# Altium PCB Thunderscope_Rev5.3.PcbDoc (part 12 of 14)
Units mil, origin at the board's own origin, x right, y up, seen from the top; angles counter-clockwise.
Board outline 3937.01 x 3838.58 mil, 6 copper layers (F.Cu, In1.Cu (GND), In2.Cu (Sign), In3.Cu (Sign), In4.Cu (GND), B.Cu), stack 60.556 mil thick; 911 components, 486 nets, 2834 pads, 2761 vias.
Unrouted connection lines stored in the file: 618.
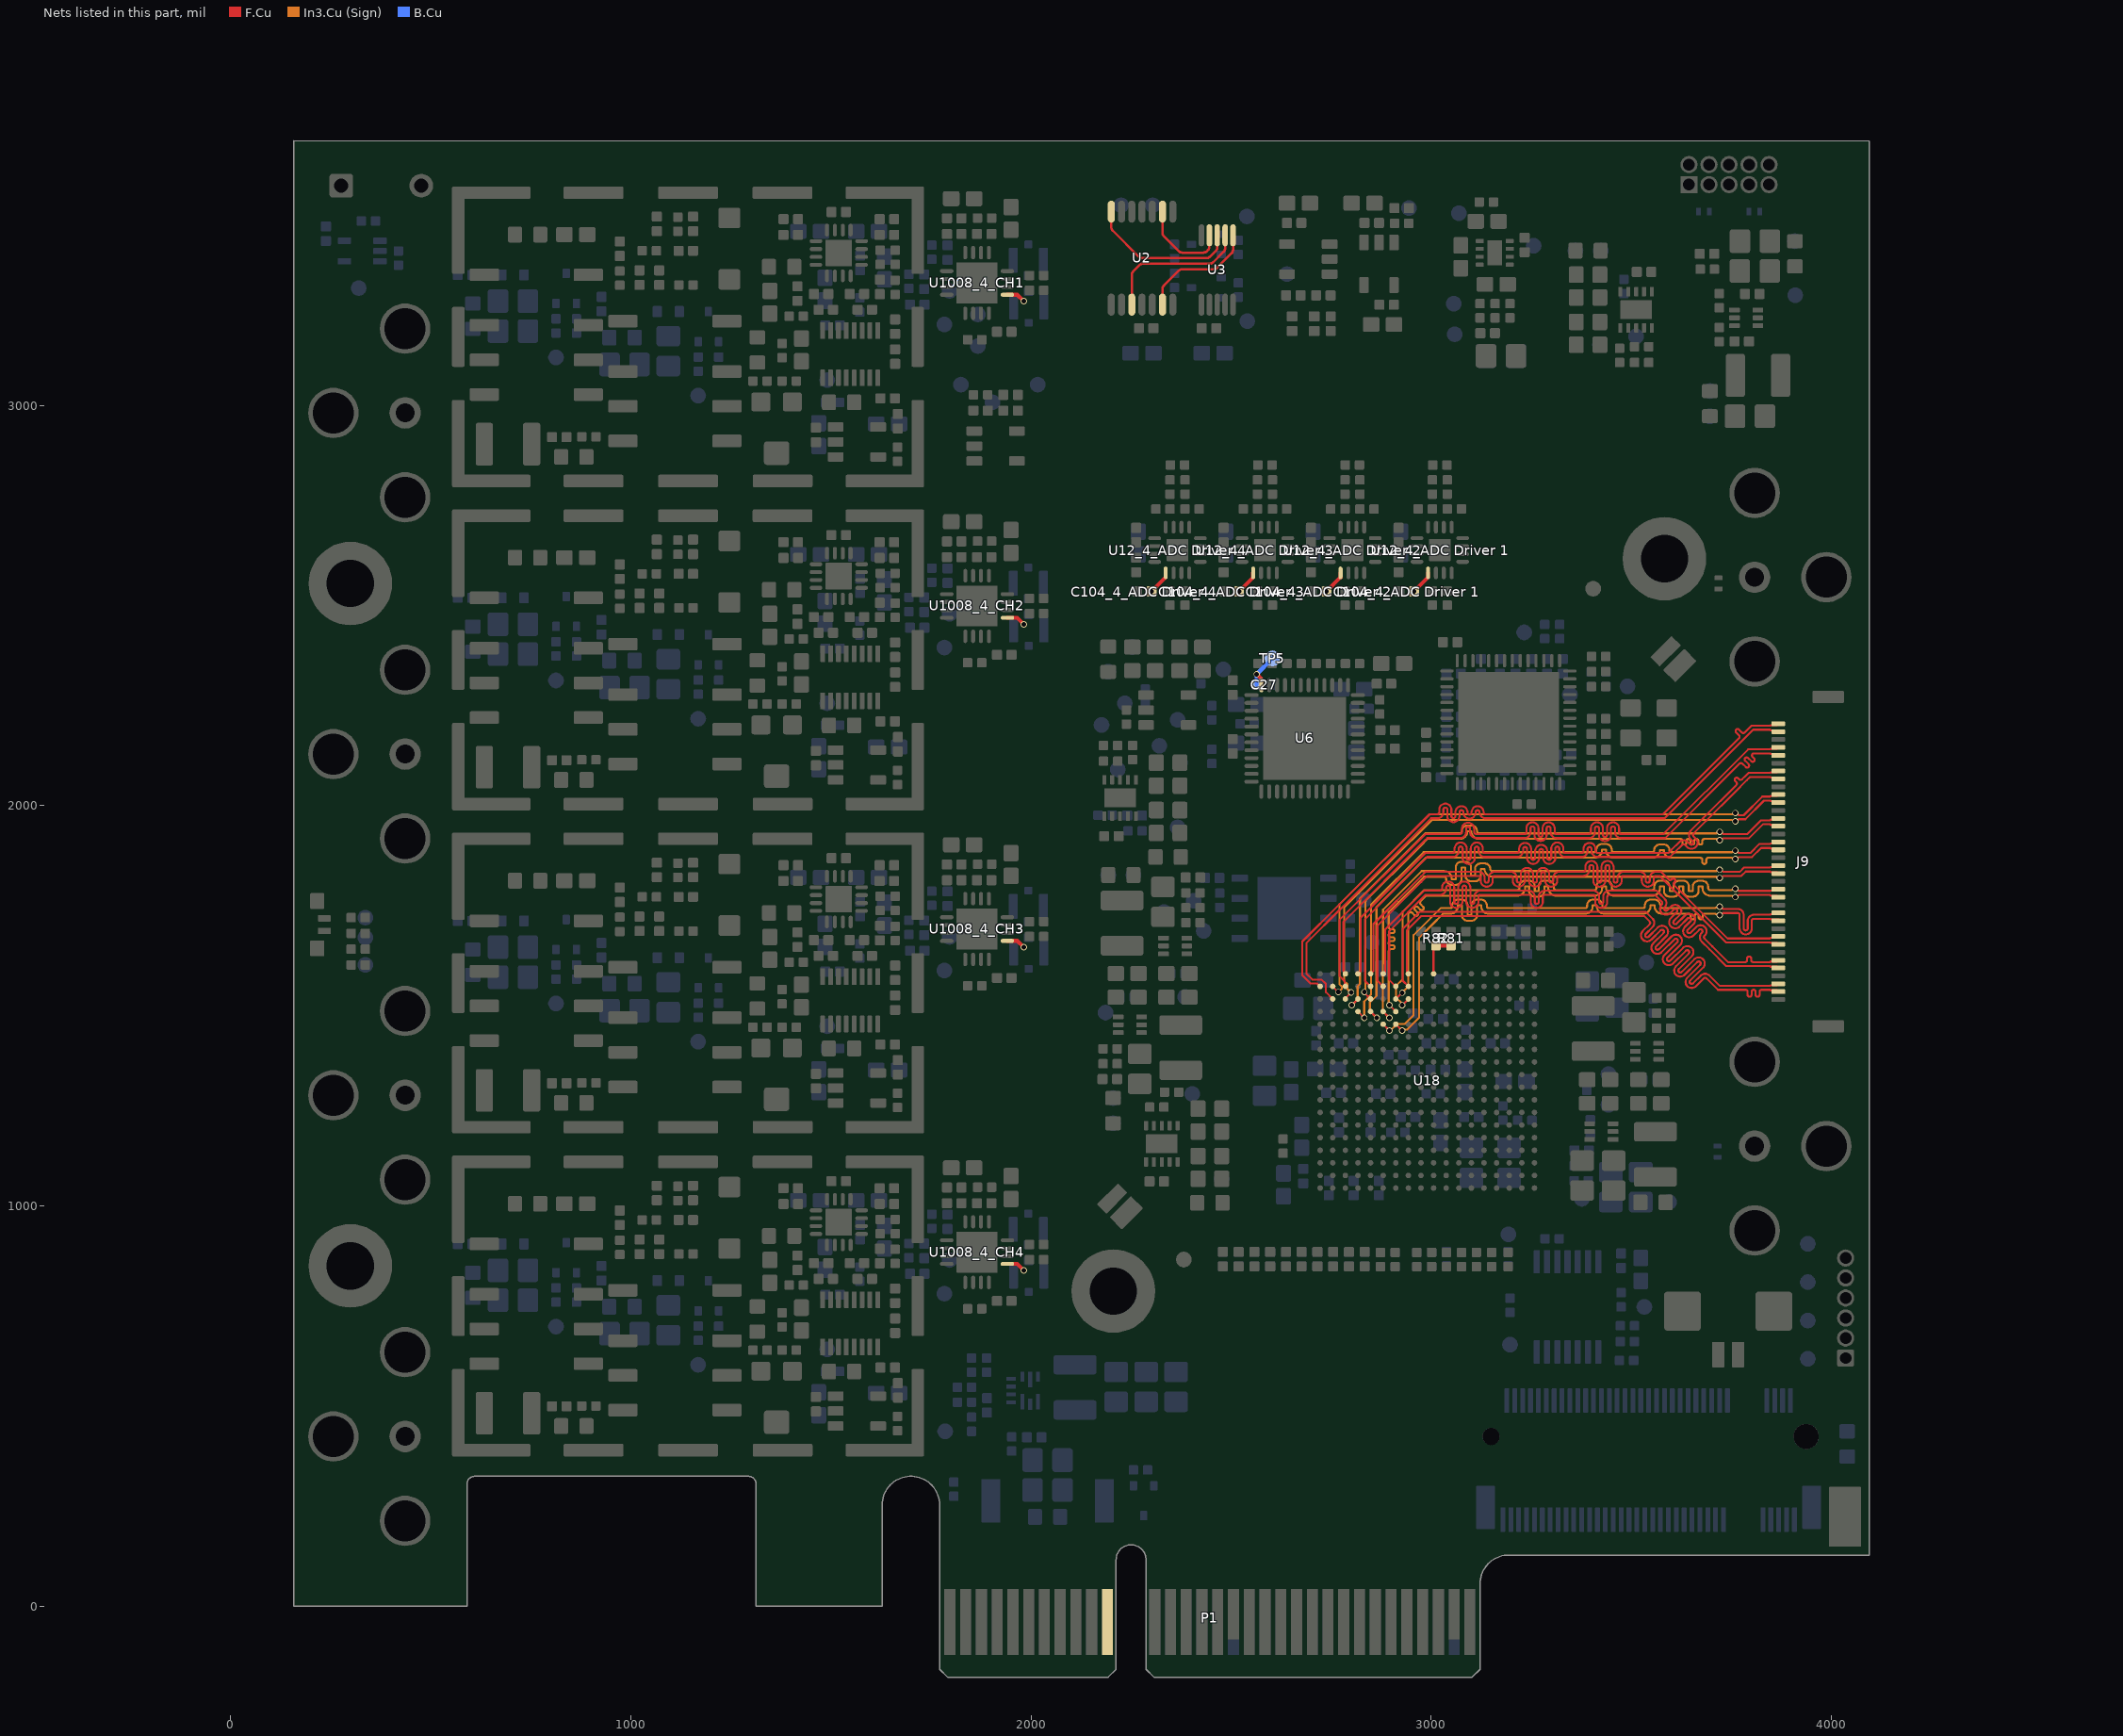
[diagram p15: the nets of this part, all layers, seen from the top]

## Via types
v1: diameter 16, hole 11.81, F.Cu to B.Cu, tented both sides, 2761 vias

## Nets (pads, with @x,y where several pads share a name; then routed paths per layer and width w, separated by ;. In a path a pad name is that pad's centre, name@x,y a point inside that pad or via, vN(x,y) a via of type N, cw(c..) or ccw(c..) an arc to the next point about the centre after c; other vN are vias at no path point) (continued)
USERIO.USRIO_1_N: J9.8 U18.F17 | length 1678.7
  F.Cu w5: U18.F17@2879.92,1548.72 2865.49,1563.15 2865.49,1700.14 2974.98,1809.63 2990.16,1824.8 3118.4,1824.8 cw(c3118.4,1819.8) 3123.4,1819.8 3123.4,1812.81 ccw(c3138.53,1812.81) 3138.53,1797.69 ccw(c3138.53,1812.81) 3153.65,1812.81 3153.65,1819.8 cw(c3158.65,1819.8) 3158.65,1824.8 3198.91,1824.8 cw(c3198.91,1819.8) 3203.91,1819.8 3203.91,1812.81 ccw(c3219.03,1812.81) 3219.03,1797.69 ccw(c3219.03,1812.81) 3234.16,1812.81 3234.16,1829.44 cw(c3239.16,1829.44) 3239.16,1834.44 cw(c3239.16,1829.44) 3244.16,1829.44 3244.16,1812.81 ccw(c3259.29,1812.81) 3259.29,1797.69 ccw(c3259.29,1812.81) 3274.42,1812.81 3274.42,1829.44 cw(c3279.42,1829.44) 3279.42,1834.44 cw(c3279.42,1829.44) 3284.42,1829.44 3284.42,1812.81 ccw(c3299.54,1812.81) 3299.54,1797.69 ccw(c3299.54,1812.81) 3314.67,1812.81 3314.67,1819.8 cw(c3319.67,1819.8) 3319.67,1824.8 3380.05,1824.8 ccw(c3380.05,1839.93) 3395.18,1839.93 3395.18,1846.92 cw(c3400.18,1846.92) 3400.18,1851.92 cw(c3400.18,1846.92) 3405.18,1846.92 3405.18,1812.81 ccw(c3420.3,1812.81) 3420.3,1797.69 ccw(c3420.3,1812.81) 3435.43,1812.81 3435.43,1846.92 cw(c3440.43,1846.92) 3440.43,1851.92 cw(c3440.43,1846.92) 3445.43,1846.92 3445.43,1812.81 ccw(c3460.56,1812.81) 3460.56,1797.69 ccw(c3460.56,1812.81) 3475.68,1812.81 3475.68,1819.8 cw(c3480.68,1819.8) 3480.68,1824.8 3520.94,1824.8 cw(c3520.94,1819.8) 3525.94,1819.8 3525.94,1812.81 ccw(c3541.06,1812.81) 3541.06,1797.69 ccw(c3541.06,1812.81) 3556.19,1812.81 3556.19,1819.8 cw(c3561.19,1819.8) 3561.19,1824.8 3569.94,1824.8 3580.72,1814.02 3590.38,1804.36 3736.42,1658.32 3847.04,1658.32 3848.41,1656.95 3863.72,1656.95 J9.8@3867.13,1653.54
USERIO.USRIO_1_P: J9.9 U18.E18 | length 1675.1
  F.Cu w5: U18.E18@2848.43,1580.22 2855.37,1587.16 2855.37,1704.33 2974.98,1823.95 2985.96,1834.93 3118.4,1834.93 cw(c3118.4,1819.8) 3133.53,1819.8 3133.53,1812.81 ccw(c3138.53,1812.81) 3138.53,1807.81 ccw(c3138.53,1812.81) 3143.53,1812.81 3143.53,1819.8 cw(c3158.65,1819.8) 3158.65,1834.93 3198.91,1834.93 cw(c3198.91,1819.8) 3214.03,1819.8 3214.03,1812.81 ccw(c3219.03,1812.81) 3219.03,1807.81 ccw(c3219.03,1812.81) 3224.03,1812.81 3224.03,1829.44 cw(c3239.16,1829.44) 3239.16,1844.57 cw(c3239.16,1829.44) 3254.29,1829.44 3254.29,1812.81 ccw(c3259.29,1812.81) 3259.29,1807.81 ccw(c3259.29,1812.81) 3264.29,1812.81 3264.29,1829.44 cw(c3279.42,1829.44) 3279.42,1844.57 cw(c3279.42,1829.44) 3294.54,1829.44 3294.54,1812.81 ccw(c3299.54,1812.81) 3299.54,1807.81 ccw(c3299.54,1812.81) 3304.54,1812.81 3304.54,1819.8 cw(c3319.67,1819.8) 3319.67,1834.93 3380.05,1834.93 ccw(c3380.05,1839.93) 3385.05,1839.93 3385.05,1846.92 cw(c3400.18,1846.92) 3400.18,1862.05 cw(c3400.18,1846.92) 3415.3,1846.92 3415.3,1812.81 ccw(c3420.3,1812.81) 3420.3,1807.81 ccw(c3420.3,1812.81) 3425.3,1812.81 3425.3,1846.92 cw(c3440.43,1846.92) 3440.43,1862.05 cw(c3440.43,1846.92) 3455.56,1846.92 3455.56,1812.81 ccw(c3460.56,1812.81) 3460.56,1807.81 ccw(c3460.56,1812.81) 3465.56,1812.81 3465.56,1819.8 cw(c3480.68,1819.8) 3480.68,1834.93 3520.94,1834.93 cw(c3520.94,1819.8) 3536.06,1819.8 3536.06,1812.81 ccw(c3541.06,1812.81) 3541.06,1807.81 ccw(c3541.06,1812.81) 3546.06,1812.81 3546.06,1819.8 cw(c3561.19,1819.8) 3561.19,1834.93 3574.13,1834.93 3587.88,1821.18 3590.38,1818.68 3591.53,1817.53 3593.3,1815.76 ccw(c3596.84,1819.29) 3600.37,1815.76 3601.36,1816.74 cw(c3604.89,1813.21) 3608.43,1816.74 cw(c3604.89,1813.21) 3608.43,1809.67 3607.44,1808.69 ccw(c3610.98,1805.15) 3607.44,1801.62 3623.21,1785.85 3624.98,1784.08 3740.61,1668.45 3847.04,1668.45 3848.41,1669.82 3863.72,1669.82 J9.9@3867.13,1673.23
USERIO.USRIO_2_N: J9.5 U18.G17 | length 1689.7
  F.Cu w5: U18.G17@2911.42,1548.72 2894.97,1565.17 2894.97,1686.31 2986.22,1777.56 3014.61,1777.56 3022.17,1777.56 ccw(c3022.17,1792.69) 3037.3,1792.69 3037.3,1795.6 cw(c3042.3,1795.6) 3042.3,1800.6 cw(c3042.3,1795.6) 3047.3,1795.6 3047.3,1759.78 ccw(c3062.43,1759.78) 3062.43,1744.66 ccw(c3062.43,1759.78) 3077.55,1759.78 3077.55,1795.6 cw(c3082.55,1795.6) 3082.55,1800.6 cw(c3082.55,1795.6) 3087.55,1795.6 3087.55,1759.78 ccw(c3102.68,1759.78) 3102.68,1744.66 ccw(c3102.68,1759.78) 3117.81,1759.78 3117.81,1772.56 cw(c3122.81,1772.56) 3122.81,1777.56 3243.57,1777.56 cw(c3243.57,1772.56) 3248.57,1772.56 3248.57,1759.78 ccw(c3263.7,1759.78) 3263.7,1744.66 ccw(c3263.7,1759.78) 3278.82,1759.78 3278.82,1772.56 cw(c3283.82,1772.56) 3283.82,1777.56 3404.58,1777.56 cw(c3404.58,1772.56) 3409.58,1772.56 3409.58,1759.78 ccw(c3424.71,1759.78) 3424.71,1744.66 ccw(c3424.71,1759.78) 3439.84,1759.78 3439.84,1772.56 cw(c3444.84,1772.56) 3444.84,1777.56 3529.86,1777.56 3552.95,1777.56 3559.06,1777.56 3562.84,1773.79 3576.1,1760.52 cw(c3572.56,1756.99) 3576.1,1753.45 ccw(c3586.79,1742.76) 3576.06,1732.1 3576.13,1732.03 ; 3576.14,1732.02 ccw(c3586.79,1742.76) 3597.49,1732.06 3606.17,1740.74 cw(c3609.71,1737.2) 3613.24,1740.74 cw(c3609.71,1737.2) 3613.24,1733.67 3599.17,1719.6 ccw(c3609.87,1708.9) 3599.17,1698.21 ccw(c3609.87,1708.9) 3618.84,1696.72 3619.08,1696.72 3640.78,1718.42 cw(c3644.32,1714.89) 3647.85,1718.42 cw(c3644.32,1714.89) 3647.85,1711.35 ; 3647.83,1711.33 3633.81,1697.31 ccw(c3644.51,1686.62) 3653.48,1674.44 3653.72,1674.44 3669.24,1689.96 cw(c3672.78,1686.42) 3676.32,1689.96 cw(c3672.78,1686.43) 3676.32,1682.89 ; 3676.29,1682.86 3675.72,1682.29 ccw(c3686.42,1671.6) 3675.72,1660.9 3695.3,1641.32 3737.35,1599.27 3847.04,1599.27 3848.41,1597.89 3863.72,1597.89 J9.5@3867.13,1594.49
USERIO.USRIO_2_P: J9.6 U18.F18 | length 1689.9
  F.Cu w5: U18.F18@2879.92,1580.22 2884.84,1585.14 2884.84,1690.5 2982.03,1787.69 2992.92,1787.69 3014.61,1787.69 3022.17,1787.69 ccw(c3022.17,1792.69) 3027.17,1792.69 3027.17,1795.6 cw(c3042.3,1795.6) 3042.3,1810.73 cw(c3042.3,1795.6) 3057.43,1795.6 3057.43,1759.78 ccw(c3062.43,1759.78) 3062.43,1754.78 ccw(c3062.43,1759.78) 3067.43,1759.78 3067.43,1795.6 cw(c3082.55,1795.6) 3082.55,1810.73 cw(c3082.55,1795.6) 3097.68,1795.6 3097.68,1759.78 ccw(c3102.68,1759.78) 3102.68,1754.78 ccw(c3102.68,1759.78) 3107.68,1759.78 3107.68,1772.56 cw(c3122.81,1772.56) 3122.81,1787.69 3243.57,1787.69 cw(c3243.57,1772.56) 3258.7,1772.56 3258.7,1759.78 ccw(c3263.7,1759.78) 3263.7,1754.78 ccw(c3263.7,1759.78) 3268.7,1759.78 3268.7,1772.56 cw(c3283.82,1772.56) 3283.82,1787.69 3404.58,1787.69 cw(c3404.58,1772.56) 3419.71,1772.56 3419.71,1759.78 ccw(c3424.71,1759.78) 3424.71,1754.78 ccw(c3424.71,1759.78) 3429.71,1759.78 3429.71,1772.56 cw(c3444.84,1772.56) 3444.84,1787.69 3529.86,1787.69 3563.07,1787.69 3563.26,1787.69 3570,1780.95 3583.26,1767.68 cw(c3572.56,1756.99) 3583.26,1746.29 ccw(c3586.79,1742.76) 3583.26,1739.22 ccw(c3586.79,1742.76) 3590.33,1739.22 3599.05,1747.94 cw(c3609.71,1737.2) 3620.4,1747.9 cw(c3609.71,1737.2) 3620.4,1726.51 3606.33,1712.44 ccw(c3609.87,1708.9) 3606.33,1705.37 ccw(c3609.87,1708.9) 3613.4,1705.37 ; 3613.43,1705.39 3633.66,1725.62 cw(c3644.32,1714.89) 3655.01,1725.58 cw(c3644.32,1714.89) 3656.5,1705.92 3656.5,1705.68 3640.97,1690.15 ccw(c3644.51,1686.62) 3640.97,1683.08 ccw(c3644.51,1686.62) 3648.04,1683.08 3662.12,1697.16 cw(c3672.78,1686.42) 3683.48,1697.12 cw(c3672.78,1686.43) 3684.96,1677.45 3684.96,1677.21 3682.88,1675.13 ccw(c3686.42,1671.6) 3682.88,1668.06 3702.46,1648.48 3741.55,1609.39 3781.92,1609.39 3784.42,1609.39 ccw(c3784.42,1614.39) 3789.42,1614.39 3789.42,1618.55 cw(c3794.42,1618.55) 3799.42,1618.55 3799.42,1614.39 ccw(c3804.42,1614.39) 3804.42,1609.39 3824.88,1609.39 3847.04,1609.39 3848.41,1610.77 3863.72,1610.77 J9.6@3867.13,1614.17
USERIO.USRIO_3_N: J9.2 U18.H18 | length 1689.4
  F.Cu w5: U18.H18@2942.91,1580.22 2939.26,1583.87 2939.26,1688.72 2945.13,1694.58 2972.02,1721.48 2975.07,1724.53 3511.75,1724.53 3529.6,1724.53 3532.03,1724.53 3545.59,1710.98 ; 3545.6,1710.96 cw(c3542.08,1707.41) 3545.62,1703.88 3528.69,1686.95 ccw(c3539.38,1676.25) 3528.69,1665.55 ccw(c3539.38,1676.25) 3550.08,1665.55 3573.18,1688.66 cw(c3576.72,1685.12) 3580.25,1688.66 cw(c3576.72,1685.12) 3580.25,1681.59 ; 3580.23,1681.56 3554.59,1655.92 ccw(c3565.29,1645.23) 3554.59,1634.53 ccw(c3565.29,1645.23) 3574.26,1633.05 3574.5,1633.05 3607.82,1666.37 cw(c3611.36,1662.84) 3614.89,1666.37 cw(c3611.36,1662.84) 3614.89,1659.3 ; 3614.87,1659.27 3583.05,1627.46 ccw(c3593.75,1616.76) 3583.05,1606.07 ccw(c3593.75,1616.76) 3602.72,1604.58 3602.96,1604.58 3636.29,1637.91 cw(c3639.82,1634.37) 3643.36,1637.91 cw(c3639.82,1634.37) 3643.36,1630.84 ; 3643.33,1630.81 3611.52,1599 ccw(c3622.21,1588.3) 3631.18,1576.12 3631.43,1576.12 3664.75,1609.44 cw(c3668.29,1605.91) 3671.82,1609.44 cw(c3668.29,1605.91) 3671.82,1602.37 ; 3671.8,1602.35 3639.98,1570.53 ccw(c3650.68,1559.84) 3659.65,1547.66 3659.89,1547.66 3680.86,1568.63 cw(c3684.4,1565.1) 3687.95,1568.61 3693.28,1563.28 3716.35,1540.21 3773,1540.21 3785.5,1540.21 cw(c3785.5,1535.21) 3790.5,1535.21 3790.5,1527.78 ccw(c3795.5,1527.78) 3800.5,1527.78 3800.5,1535.21 cw(c3805.5,1535.21) 3810.5,1535.21 3810.5,1527.78 ccw(c3815.5,1527.78) 3820.5,1527.78 3820.5,1535.21 cw(c3825.5,1535.21) 3825.5,1540.21 3839.67,1540.21 3847.04,1540.21 3848.41,1538.84 3863.72,1538.84 J9.2@3867.13,1535.43
USERIO.USRIO_3_P: J9.3 U18.H17 | length 1690
  F.Cu w5: U18.H17@2942.91,1548.72 2928.48,1563.15 2928.48,1692.26 2937.97,1701.75 2964.86,1728.64 2970.88,1734.66 3521.87,1734.66 3529.6,1734.66 3536.23,1734.66 3552.78,1718.11 ; 3552.8,1718.09 3554.26,1716.62 3554.26,1716.38 cw(c3542.08,1707.41) 3552.78,1696.72 3535.85,1679.78 ccw(c3539.38,1676.25) 3535.85,1672.71 ccw(c3539.38,1676.25) 3542.92,1672.71 3566.02,1695.82 cw(c3576.72,1685.12) 3587.42,1695.82 cw(c3576.72,1685.12) 3588.9,1676.15 3588.9,1675.91 3561.75,1648.76 ccw(c3565.29,1645.23) 3561.75,1641.69 ccw(c3565.29,1645.23) 3568.82,1641.69 ; 3568.85,1641.72 3600.7,1673.57 cw(c3611.36,1662.84) 3622.06,1673.53 cw(c3611.36,1662.84) 3623.54,1653.86 3623.54,1653.62 3590.21,1620.3 ccw(c3593.75,1616.76) 3590.21,1613.23 ccw(c3593.75,1616.76) 3597.29,1613.23 3629.17,1645.11 cw(c3639.82,1634.37) 3650.52,1645.07 cw(c3639.82,1634.37) 3652,1625.4 3652,1625.16 3618.68,1591.84 ccw(c3622.21,1588.3) 3618.68,1584.76 ccw(c3622.21,1588.3) 3625.75,1584.76 ; 3625.78,1584.79 3657.63,1616.64 cw(c3668.29,1605.91) 3678.98,1616.61 cw(c3668.29,1605.91) 3680.47,1596.94 3680.47,1596.7 3647.14,1563.37 ccw(c3650.68,1559.84) 3647.14,1556.3 ccw(c3650.68,1559.84) 3654.21,1556.3 ; 3654.24,1556.33 3673.7,1575.79 cw(c3684.4,1565.1) 3693.37,1577.27 3693.61,1577.27 3695.07,1575.81 ; 3695.09,1575.79 3700.44,1570.44 3720.55,1550.34 3847.04,1550.34 3848.41,1551.71 3863.72,1551.71 J9.3@3867.13,1555.12
USERIO.USRIO_4_N: J9.12 U18.F14 | length 1460.8
  F.Cu w5: U18.F14@2879.98,1454.1 2895.68,1438.4 v1@2895.73,1438.35 ; v1(3721,1747.59) 3723.98,1747.59 3729.41,1742.15 3737.97,1742.15 3765.66,1742.15 cw(c3765.66,1727.02) 3780.78,1727.02 3780.78,1693.58 ccw(c3785.78,1693.58) 3785.78,1688.58 ccw(c3785.78,1693.58) 3790.78,1693.58 3790.78,1712.38 cw(c3805.91,1712.38) 3805.91,1727.5 3841.88,1727.5 3847.04,1727.5 3848.41,1728.88 3863.72,1728.88 J9.12@3867.13,1732.28
  In3.Cu (Sign) w5: v1(2895.73,1438.45) 2898.17,1438.45 2914.56,1454.84 2933.64,1454.84 2955.93,1477.13 2955.93,1676.6 2964.17,1684.84 2998.35,1719.02 3023.45,1744.12 3047.5,1744.12 ccw(c3047.5,1749.12) 3052.5,1749.12 3052.5,1751.24 cw(c3066.57,1751.24) 3066.57,1765.31 3076.57,1765.31 cw(c3076.57,1751.24) 3090.64,1751.24 3090.64,1726.88 3100.64,1726.88 3100.64,1751.24 cw(c3114.71,1751.24) 3114.71,1765.31 3124.71,1765.31 cw(c3124.71,1751.24) 3138.78,1751.24 3138.78,1749.12 ccw(c3143.78,1749.12) 3143.78,1744.12 3384.47,1744.12 ccw(c3384.47,1749.12) 3389.47,1749.12 3389.47,1751.24 cw(c3403.54,1751.24) 3403.54,1765.31 3413.54,1765.31 cw(c3413.54,1751.24) 3427.61,1751.24 3427.61,1749.12 ccw(c3432.61,1749.12) 3432.61,1744.12 3528.88,1744.12 ccw(c3528.88,1749.12) 3533.88,1749.12 3533.88,1751.24 cw(c3547.95,1751.24) 3547.95,1765.31 3557.95,1765.31 cw(c3557.95,1751.24) 3572.02,1751.24 3572.02,1749.12 ccw(c3577.02,1749.12) 3577.02,1744.12 3609.88,1744.12 3709.76,1744.12 3711.12,1745.48 3718.9,1745.48 v1(3721,1747.59)
USERIO.USRIO_4_P: J9.11 U18.G14 | length 1461.9
  F.Cu w5: U18.G14@2911.47,1454.1 v1@2927.17,1438.4 ; v1(3721,1726.59) 3723.98,1726.59 3729.41,1732.02 3737.97,1732.02 3765.66,1732.02 cw(c3765.66,1727.02) 3770.66,1727.02 3770.66,1693.58 ccw(c3785.78,1693.58) 3785.78,1678.45 ccw(c3785.78,1693.58) 3800.91,1693.58 3800.91,1712.38 cw(c3805.91,1712.38) 3805.91,1717.38 3841.88,1717.38 3847.04,1717.38 3848.41,1716 3867.86,1716 J9.11@3868.45,1715.41
  In3.Cu (Sign) w5: v1(2927.22,1438.45) 2929.33,1440.55 2935.43,1440.55 2935.65,1440.77 2939.47,1440.77 2970,1471.3 2970,1670.77 3001.36,1702.13 3029.28,1730.05 3047.5,1730.05 ccw(c3047.5,1749.12) 3066.57,1749.12 3066.57,1751.24 3076.57,1751.24 3076.57,1726.88 ccw(c3090.64,1726.88) 3090.64,1712.81 3100.64,1712.81 ccw(c3100.64,1726.88) 3114.71,1726.88 3114.71,1751.24 3124.71,1751.24 3124.71,1749.12 ccw(c3143.78,1749.12) 3143.78,1730.05 3384.47,1730.05 ccw(c3384.47,1749.12) 3403.54,1749.12 3403.54,1751.24 3413.54,1751.24 3413.54,1749.12 ccw(c3432.61,1749.12) 3432.61,1730.05 3528.88,1730.05 ccw(c3528.88,1749.12) 3547.95,1749.12 3547.95,1751.24 3557.95,1751.24 3557.95,1749.12 ccw(c3577.02,1749.12) 3577.02,1730.05 3609.88,1730.05 3630.91,1730.05 3643.41,1730.05 cw(c3643.41,1725.05) 3648.41,1725.05 3648.41,1721.18 ccw(c3653.41,1721.18) 3658.41,1721.18 3658.41,1725.05 cw(c3663.41,1725.05) 3668.41,1725.05 3668.41,1721.18 ccw(c3673.41,1721.18) 3678.41,1721.18 3678.41,1725.05 cw(c3683.41,1725.05) 3683.41,1730.05 3702.79,1730.05 3709.76,1730.05 3711.12,1728.69 3718.9,1728.69 v1(3721,1726.59)
USERIO.USRIO_5_N: J9.15 U18.H16 | length 1443.6
  F.Cu w5: v1(2927.22,1501.34) U18.H16@2942.97,1517.09 ; v1(3760,1792.84) 3762.98,1792.84 3768.41,1787.41 3847.04,1787.41 3847.56,1787.93 3863.72,1787.93 J9.15@3867.13,1791.34
  In3.Cu (Sign) w5: v1(2927.22,1501.34) 2927.22,1506.26 2911.82,1521.66 2911.82,1549.62 2928.7,1566.49 2928.7,1735.94 2982.13,1789.38 3157.8,1789.38 3215.48,1789.38 ccw(c3215.48,1794.38) 3220.48,1794.38 3220.48,1798.62 cw(c3234.55,1798.62) 3234.55,1812.69 3244.55,1812.69 cw(c3244.55,1798.62) 3258.62,1798.62 3258.61,1787.06 3268.61,1787.06 3268.61,1798.62 cw(c3282.68,1798.62) 3282.68,1812.69 3292.68,1812.69 cw(c3292.68,1798.62) 3306.75,1798.62 3306.75,1794.38 ccw(c3311.75,1794.38) 3311.75,1789.38 3408.03,1789.38 ccw(c3408.03,1794.38) 3413.03,1794.38 3413.03,1798.62 cw(c3427.1,1798.62) 3427.1,1812.69 3437.1,1812.69 cw(c3437.1,1798.62) 3451.17,1798.62 3451.17,1794.38 ccw(c3456.17,1794.38) 3456.17,1789.38 3552.44,1789.38 ccw(c3552.44,1794.38) 3557.44,1794.38 3557.44,1798.62 cw(c3571.51,1798.62) 3571.51,1812.69 3581.51,1812.69 cw(c3581.51,1798.62) 3595.58,1798.62 3595.58,1787.06 3605.58,1787.06 3605.58,1798.62 cw(c3619.65,1798.62) 3619.65,1812.69 3629.65,1812.69 cw(c3629.65,1798.62) 3643.72,1798.62 3643.72,1787.06 3653.72,1787.06 3653.72,1798.19 cw(c3667.79,1798.19) 3667.79,1812.26 3677.79,1812.26 cw(c3677.79,1798.19) 3691.86,1798.19 3691.86,1794.38 ccw(c3696.86,1794.38) 3696.86,1789.38 3722.59,1789.38 3751.57,1789.38 3752.93,1790.74 3757.9,1790.74 v1(3760,1792.84)
USERIO.USRIO_5_P: J9.14 U18.G16 | length 1445
  F.Cu w5: U18.G16@2911.47,1517.09 2911.51,1517.13 v1@2927.22,1532.84 ; v1(3760,1771.84) 3762.98,1771.84 3768.41,1777.28 3846.19,1777.28 3848.41,1775.06 3863.72,1775.06 J9.14@3867.13,1771.65 ; J9.14@3869.22,1773.75 J9.14@3871.32,1771.65
  In3.Cu (Sign) w5: v1@2927.22,1532.84 2942.27,1547.89 2942.27,1721.28 2942.27,1730.12 2944.93,1732.77 cw(c2948.46,1729.23) 2952,1732.77 2958.56,1726.21 ccw(c2962.09,1729.74) 2965.63,1726.21 ccw(c2962.09,1729.74) 2965.63,1733.28 2959.31,1739.59 cw(c2962.85,1743.13) 2959.31,1746.66 cw(c2962.85,1743.13) 2966.38,1746.66 2972.7,1740.35 ccw(c2976.24,1743.88) 2979.77,1740.35 ccw(c2976.24,1743.88) 2979.77,1747.42 2973.21,1753.98 cw(c2976.75,1757.52) 2973.21,1761.05 2987.47,1775.31 2996.79,1775.31 3157.8,1775.31 3215.48,1775.31 ccw(c3215.48,1794.38) 3234.55,1794.38 3234.55,1798.62 3244.55,1798.62 3244.55,1787.06 ccw(c3258.61,1787.06) 3258.61,1772.99 3268.61,1772.99 ccw(c3268.61,1787.06) 3282.68,1787.06 3282.68,1798.62 3292.68,1798.62 3292.68,1794.38 ccw(c3311.75,1794.38) 3311.75,1775.31 3408.03,1775.31 ccw(c3408.03,1794.38) 3427.1,1794.38 3427.1,1798.62 3437.1,1798.62 3437.1,1794.38 ccw(c3456.17,1794.38) 3456.17,1775.31 3552.44,1775.31 ccw(c3552.44,1794.38) 3571.51,1794.38 3571.51,1798.62 3581.51,1798.62 3581.51,1787.06 ccw(c3595.58,1787.06) 3595.58,1772.99 3605.58,1772.99 ccw(c3605.58,1787.06) 3619.65,1787.06 3619.65,1798.62 3629.65,1798.62 3629.65,1787.06 ccw(c3643.72,1787.06) 3643.72,1772.99 3653.72,1772.99 ccw(c3653.72,1787.06) 3667.79,1787.06 3667.79,1798.19 3677.79,1798.19 3677.79,1794.38 ccw(c3696.86,1794.38) 3696.86,1775.31 3722.59,1775.31 3751.57,1775.31 3752.93,1773.95 3757.9,1773.95 v1(3760,1771.84)
  other v1: 2927.71,1532.84
USERIO.USRIO_6_N: J9.18 U18.F15 | length 1450.6
  F.Cu w5: U18.F15@2879.98,1485.59 2895.68,1469.89 v1(2895.73,1469.94) ; v1(3721,1840.22) 3723.98,1840.22 3729.41,1834.79 3770.73,1834.79 3781.56,1845.61 3847.04,1845.61 3848.41,1846.99 3863.72,1846.99 J9.18@3867.13,1850.39
  In3.Cu (Sign) w5: v1(2895.73,1469.94) 2895.13,1469.94 2879.38,1485.69 2879.38,1495.01 2879.34,1495.05 2879.34,1508.62 2879.38,1508.66 2879.38,1603.88 2879.54,1604.04 2879.54,1709.29 2879.62,1709.36 2879.62,1740.37 2976,1836.75 2977.36,1836.75 2998.66,1836.76 3032.26,1836.76 cw(c3032.26,1817.69) 3051.33,1817.69 3051.33,1816.55 3061.33,1816.55 3061.33,1845.88 cw(c3075.4,1845.88) 3075.4,1859.95 3085.4,1859.95 cw(c3085.4,1845.88) 3099.47,1845.88 3099.47,1825.44 3109.47,1825.44 3109.47,1841.76 cw(c3123.54,1841.76) 3123.54,1855.83 3133.54,1855.83 cw(c3133.54,1841.76) 3147.61,1841.76 ccw(c3152.61,1841.76) 3152.61,1836.76 3408.92,1836.76 3712.57,1836.76 3713.93,1838.12 3718.9,1838.12 v1(3721,1840.22)
USERIO.USRIO_6_P: J9.17 U18.G15 | length 1448.5
  F.Cu w5: v1@2895.73,1501.34 U18.G15@2911.47,1485.59 ; v1(3721,1819.22) 3723.98,1819.22 3729.41,1824.66 3774.93,1824.66 3785.76,1835.49 3847.04,1835.49 3848.41,1834.11 3863.72,1834.11 J9.17@3867.13,1830.71
  In3.Cu (Sign) w5: v1@2893.76,1504.64 2893.76,1624.22 2893.75,1626.72 2893.75,1636.72 cw(c2898.75,1636.72) 2898.75,1641.72 2903.45,1641.72 ccw(c2903.45,1646.72) 2903.45,1651.72 2898.61,1651.72 cw(c2898.61,1656.72) 2898.61,1661.72 2903.45,1661.72 ccw(c2903.45,1666.72) 2903.45,1671.72 2898.61,1671.72 cw(c2898.61,1676.72) 2898.61,1681.72 2903.45,1681.72 ccw(c2903.45,1686.72) 2903.45,1691.72 2898.69,1691.72 cw(c2898.69,1696.72) 2893.69,1696.72 2893.69,1706.86 2893.68,1709.36 2893.68,1734.54 2918.43,1759.29 2981.81,1822.69 2998.66,1822.69 3032.26,1822.69 cw(c3032.26,1817.69) 3037.26,1817.69 3037.26,1816.55 ccw(c3051.33,1816.55) 3051.33,1802.48 3061.33,1802.48 ccw(c3061.33,1816.55) 3075.4,1816.55 3075.4,1845.88 3085.4,1845.88 3085.4,1825.44 ccw(c3099.47,1825.44) 3099.47,1811.37 3109.47,1811.37 ccw(c3109.47,1825.44) 3123.54,1825.44 3123.54,1841.76 3133.54,1841.76 ccw(c3152.61,1841.76) 3152.61,1822.69 3408.92,1822.69 3712.57,1822.69 3713.93,1821.33 3718.9,1821.33 v1(3721,1819.22)
  other v1: 2895.73,1501.83
USERIO.USRIO_7_N: J9.21 U18.D15 | length 1445.5
  F.Cu w5: U18.D15@2816.99,1485.59 v1@2832.73,1469.84 ; v1(3760,1887.48) 3762.98,1887.48 3768.41,1882.04 3797.59,1882.04 3820.22,1904.67 3847.04,1904.67 3848.41,1906.04 3863.72,1906.04 J9.21@3867.13,1909.45
  In3.Cu (Sign) w5: v1@2832.46,1469.62 2832.46,1510.88 2849.18,1527.59 2849.18,1742.76 ; 2849.2,1742.79 2849.2,1752.73 2980.48,1884 3015.22,1884 3398.2,1884.01 3404.09,1884.01 3407.74,1884.01 ccw(c3407.74,1889.01) 3412.74,1889.01 3412.74,1890.16 cw(c3426.8,1890.16) 3426.8,1904.22 3436.8,1904.22 cw(c3436.8,1890.16) 3450.86,1890.16 3450.86,1889.01 ccw(c3455.86,1889.01) 3455.86,1884.01 3552.11,1884.01 ccw(c3552.11,1889.01) 3557.11,1889.01 cw(c3571.17,1889.01) 3571.17,1903.07 3581.17,1903.07 cw(c3581.17,1889.01) 3595.23,1889.01 ccw(c3600.23,1889.01) 3600.23,1884.01 3609.71,1884.01 3622.15,1884.01 3751.57,1884.01 3752.93,1885.37 3757.9,1885.37 v1(3760,1887.48)
  other v1: 2832.73,1470.34
USERIO.USRIO_7_P: J9.20 U18.E15 | length 1451.8
  F.Cu w5: U18.E15@2848.48,1485.59 2864.18,1469.89 v1(2864.23,1469.94) ; v1(3760,1866.48) 3762.98,1866.48 3768.41,1871.91 3801.78,1871.91 3824.41,1894.54 3847.04,1894.54 3848.41,1893.17 3863.72,1893.17 J9.20@3867.13,1889.76
  In3.Cu (Sign) w5: 2863.24,1742.76 2863.24,1525.02 2846.61,1508.39 2846.61,1486.97 2863.64,1469.94 v1(2864.23,1469.94) ; 2863.26,1742.77 2863.26,1746.91 2986.3,1869.95 3398.2,1869.95 3398.26,1869.95 3407.74,1869.94 ccw(c3407.74,1889.01) 3426.8,1889.01 3426.8,1890.16 3436.8,1890.16 3436.8,1889.01 ccw(c3455.86,1889.01) 3455.86,1869.94 3552.11,1869.94 ccw(c3552.11,1889.01) 3571.17,1889.01 3581.17,1889.01 ccw(c3600.23,1889.01) 3600.23,1869.94 3609.71,1869.94 3622.15,1869.94 3659.87,1869.94 3672.37,1869.94 cw(c3672.37,1864.94) 3677.37,1864.94 3677.37,1859.5 ccw(c3682.37,1859.5) 3687.37,1859.5 3687.37,1864.94 cw(c3692.37,1864.94) 3692.37,1869.94 3704.63,1869.94 3751.57,1869.94 3752.93,1868.58 3757.9,1868.58 v1(3760,1866.48)
USERIO.USRIO_8_N: J9.24 U18.D16 | length 1452.1
  F.Cu w5: v1(2801.24,1501.83) 2801.73,1501.83 U18.D16@2816.99,1517.09 ; v1(3721,1934.57) 3723.98,1934.57 3729.41,1929.13 3789.94,1929.13 3824.54,1963.72 3847.04,1963.72 3848.41,1965.1 3863.72,1965.1 J9.24@3867.13,1968.5
  In3.Cu (Sign) w5: v1(2801.24,1501.83) 2816,1516.6 2816,1549.08 2821.91,1554.98 2821.91,1768.16 2973.95,1920.2 2984.85,1931.1 3071.23,1931.1 ccw(c3071.23,1936.1) 3076.23,1936.1 3076.23,1936.41 cw(c3090.3,1936.41) 3090.3,1950.48 3100.3,1950.48 cw(c3100.3,1936.41) 3114.36,1936.41 3114.36,1936.1 ccw(c3119.36,1936.1) 3119.36,1931.1 3522.88,1931.1 3535.33,1931.1 3712.57,1931.1 3713.93,1932.46 3718.9,1932.46 v1(3721,1934.57)
USERIO.USRIO_8_P: J9.23 U18.E16 | length 1448.6
  F.Cu w5: v1@2832.73,1532.84 2848.39,1517.18 U18.E16@2848.48,1517.09 ; v1(3721,1913.57) 3723.98,1913.57 3729.41,1919 3794.14,1919 3828.73,1953.6 3847.04,1953.6 3848.41,1952.22 3863.72,1952.22 J9.23@3867.13,1948.82
  In3.Cu (Sign) w5: v1(2832.73,1534.31) 2835.69,1537.27 2835.69,1762.45 2836.08,1762.45 2963.72,1890.09 2974.55,1900.91 2990.68,1917.04 3071.23,1917.04 ccw(c3071.23,1936.1) 3090.3,1936.1 3090.3,1936.41 3100.3,1936.41 3100.3,1936.1 ccw(c3119.36,1936.1) 3119.36,1917.04 3522.88,1917.04 3535.33,1917.03 3610,1917.03 3622.5,1917.03 cw(c3622.5,1912.03) 3627.5,1912.03 3627.5,1907.88 ccw(c3632.5,1907.88) 3637.5,1907.88 3637.5,1912.03 cw(c3642.5,1912.03) 3647.5,1912.03 3647.5,1907.88 ccw(c3652.5,1907.88) 3657.5,1907.88 3657.5,1912.03 cw(c3662.5,1912.03) 3667.5,1912.03 3667.5,1907.88 ccw(c3672.5,1907.88) 3677.5,1907.88 3677.5,1912.03 cw(c3682.5,1912.03) 3682.5,1917.03 3700.28,1917.03 3712.57,1917.03 3713.93,1915.67 3718.9,1915.67 v1(3721,1913.57)
USERIO.USRIO_9_N: J9.27 U18.B17 | length 1460.3
  F.Cu w5: U18.B17@2753.99,1548.59 2753.99,1548.09 v1(2767.77,1534.31) ; v1(3760,1981.81) 3762.98,1981.81 3768.41,1976.38 3780.86,1976.38 3827.27,2022.78 3847.04,2022.78 3848.41,2024.15 3863.72,2024.15 J9.27@3867.13,2027.56
  In3.Cu (Sign) w5: v1(2767.77,1534.31) 2768.26,1534.31 2776.69,1542.74 2776.69,1548.3 2770.48,1554.51 2770.48,1753.26 2995.56,1978.35 3751.57,1978.35 3752.93,1979.71 3757.9,1979.71 v1(3760,1981.81)
USERIO.USRIO_9_P: J9.26 U18.C16 | length 1442.1
  F.Cu w5: U18.C16@2785.49,1517.09 2785.49,1518.57 2799.66,1532.74 v1(2799.66,1533.33) ; v1(3760,1960.81) 3762.98,1960.81 3768.41,1966.25 3785.06,1966.25 3831.46,2012.65 3847.04,2012.65 3848.41,2011.28 3863.72,2011.28 J9.26@3867.13,2007.87
  In3.Cu (Sign) w5: v1(2799.66,1533.33) 2799.17,1533.33 2790.74,1541.76 2790.74,1554.12 2782.14,1562.73 2782.14,1745.05 2898.88,1861.78 3001.37,1964.28 3542.95,1964.28 3711.32,1964.28 3741.57,1964.28 3751.57,1964.28 3752.93,1962.92 3757.9,1962.92 v1(3760,1960.81)
USERIO.USRIO_10_N: J9.35 U18.B16 | length 1685.2
  F.Cu w5: U18.B16@2753.94,1517.22 2736.87,1534.29 2736.87,1554.7 2725.78,1565.79 2702.99,1565.79 2687.99,1580.78 2687.99,1656.65 2774.41,1743.07 2774.59,1743.07 2890.8,1859.28 2890.8,1859.46 2999.84,1968.5 3007.56,1968.5 3015.13,1968.5 ccw(c3015.13,1983.63) 3030.25,1983.63 3030.25,1990.3 cw(c3035.25,1990.3) 3035.25,1995.3 cw(c3035.25,1990.3) 3040.25,1990.3 3040.25,1974.14 ccw(c3055.38,1974.14) 3055.38,1959.01 ccw(c3055.38,1974.14) 3070.51,1974.14 3070.51,1983.82 cw(c3075.51,1983.82) 3075.51,1988.82 cw(c3075.51,1983.82) 3080.51,1983.82 3080.51,1982.92 ccw(c3095.63,1982.92) 3095.63,1967.79 ccw(c3095.63,1982.92) 3110.76,1982.92 3110.76,1983.63 cw(c3115.76,1983.63) 3115.76,1988.63 cw(c3115.76,1983.63) 3120.76,1983.63 ccw(c3135.89,1983.63) 3135.89,1968.5 3157.08,1968.5 3583.18,1968.5 3804.5,2189.82 3847.04,2189.82 3848.41,2188.44 3863.72,2188.44 J9.35@3867.13,2185.04
USERIO.USRIO_10_P: J9.36 U18.A17 | length 1689.6
  F.Cu w5: U18.A17@2722.44,1548.72 2715.5,1555.66 2698.79,1555.66 2677.87,1576.59 2677.87,1621.47 2677.87,1660.85 2770.22,1753.2 2770.4,1753.2 2880.67,1863.47 2880.67,1863.65 2995.65,1978.63 3007.56,1978.63 3015.13,1978.63 ccw(c3015.13,1983.63) 3020.13,1983.63 3020.13,1990.3 cw(c3035.25,1990.3) 3035.25,2005.42 cw(c3035.25,1990.3) 3050.38,1990.3 3050.38,1974.14 ccw(c3055.38,1974.14) 3055.38,1969.14 ccw(c3055.38,1974.14) 3060.38,1974.14 3060.38,1983.82 cw(c3075.51,1983.82) 3075.51,1998.95 cw(c3075.51,1983.82) 3090.63,1983.82 3090.63,1982.92 ccw(c3095.63,1982.92) 3095.63,1977.92 ccw(c3095.63,1982.92) 3100.63,1982.92 3100.63,1983.63 cw(c3115.76,1983.63) 3115.76,1998.76 cw(c3115.76,1983.63) 3130.89,1983.63 ccw(c3135.89,1983.63) 3135.89,1978.63 3157.08,1978.63 3578.99,1978.63 3767.42,2167.06 3769.18,2168.83 ccw(c3765.65,2172.36) 3769.18,2175.9 3762.08,2183 cw(c3765.62,2186.54) 3762.08,2190.07 cw(c3765.62,2186.54) 3769.15,2190.07 3776.26,2182.97 ccw(c3779.79,2186.51) 3783.33,2182.97 3790.17,2189.81 3800.3,2199.95 3847.04,2199.95 3848.41,2201.32 3863.72,2201.32 J9.36@3867.13,2204.72
USERIO.USRIO_11_N: J9.32 U18.C18 | length 1687.5
  F.Cu w5: U18.C18@2785.43,1580.22 2785.43,1582.59 2780.6,1587.42 2780.6,1709.74 2983.79,1912.93 2990.16,1919.29 3071.86,1919.29 ccw(c3071.86,1934.42) 3086.99,1934.42 3086.99,1942.66 cw(c3091.99,1942.66) 3096.99,1942.66 3096.99,1934.42 ccw(c3112.12,1934.42) 3112.12,1919.29 3232.88,1919.29 ccw(c3232.88,1934.42) 3248,1934.42 3248,1943.38 cw(c3253,1943.38) 3258,1943.38 3258,1927.27 ccw(c3273.13,1927.27) 3288.26,1927.27 3288.26,1943.38 cw(c3293.26,1943.38) 3298.26,1943.38 3298.26,1934.42 ccw(c3313.38,1934.42) 3313.38,1919.29 3393.89,1919.29 ccw(c3393.89,1934.42) 3409.02,1934.42 3409.02,1943.38 cw(c3414.02,1943.38) 3419.02,1943.38 3419.02,1926.95 ccw(c3434.14,1926.95) 3449.27,1926.95 3449.27,1943.38 cw(c3454.27,1943.38) 3459.27,1943.38 3459.27,1934.42 ccw(c3474.4,1934.42) 3474.4,1919.29 3498.3,1919.29 3507.96,1919.29 3584.57,1919.29 3759.6,2094.31 3770.28,2104.99 cw(c3773.81,2101.46) 3777.28,2105.06 3785.96,2096.71 ccw(c3789.42,2100.31) 3793.02,2096.85 ccw(c3789.42,2100.31) 3792.89,2103.92 3784.56,2111.93 cw(c3788.02,2115.53) 3784.42,2119 cw(c3788.02,2115.53) 3791.49,2119.14 3799.82,2111.12 ccw(c3803.29,2114.73) 3806.89,2111.26 ccw(c3803.29,2114.73) 3806.75,2118.33 3802.77,2122.16 cw(c3806.24,2125.76) 3806.24,2130.76 3820.93,2130.76 3847.04,2130.76 3848.41,2129.39 3863.72,2129.39 J9.32@3867.13,2125.98
USERIO.USRIO_11_P: J9.33 U18.C17 | length 1679.2
  F.Cu w5: U18.C17@2785.43,1548.72 2783.75,1550.4 2783.75,1561.94 2770.48,1575.21 2770.48,1713.93 2983.79,1927.25 2985.96,1929.42 3071.86,1929.42 ccw(c3071.86,1934.42) 3076.86,1934.42 3076.86,1942.66 cw(c3091.99,1942.66) 3107.12,1942.66 3107.12,1934.42 ccw(c3112.12,1934.42) 3112.12,1929.42 3232.88,1929.42 ccw(c3232.88,1934.42) 3237.88,1934.42 3237.88,1943.38 cw(c3253,1943.38) 3268.13,1943.38 3268.13,1927.27 ccw(c3273.13,1927.27) 3278.13,1927.27 3278.13,1943.38 cw(c3293.26,1943.38) 3308.38,1943.38 3308.38,1934.42 ccw(c3313.38,1934.42) 3313.38,1929.42 3393.89,1929.42 ccw(c3393.89,1934.42) 3398.89,1934.42 3398.89,1943.38 cw(c3414.02,1943.38) 3429.14,1943.38 3429.14,1926.95 ccw(c3434.14,1926.95) 3439.14,1926.95 3439.14,1943.38 cw(c3454.27,1943.38) 3469.4,1943.38 3469.4,1934.42 ccw(c3474.4,1934.42) 3474.4,1929.42 3498.3,1929.42 3507.96,1929.42 3580.38,1929.42 3791.85,2140.89 3847.04,2140.89 3848.41,2142.26 3863.72,2142.26 J9.33@3867.13,2145.67
USERIO.USRIO_12_N: J9.29 U18.E17 | length 1689.6
  F.Cu w5: U18.E17@2848.43,1548.72 2834,1563.15 2834,1715.89 2990.16,1872.05 3045.79,1872.05 3053.35,1872.05 ccw(c3053.35,1887.17) 3068.48,1887.17 3068.48,1892.92 cw(c3073.48,1892.92) 3073.48,1897.92 cw(c3073.48,1892.92) 3078.48,1892.92 3078.48,1869.69 ccw(c3093.6,1869.69) 3093.6,1854.57 ccw(c3093.61,1869.69) 3108.73,1869.69 3108.73,1892.92 cw(c3113.73,1892.92) 3113.73,1897.92 cw(c3113.73,1892.92) 3118.73,1892.92 3118.73,1887.17 ccw(c3133.86,1887.17) 3133.86,1872.05 3214.37,1872.05 ccw(c3214.37,1887.17) 3229.49,1887.17 3229.49,1891.91 cw(c3234.49,1891.91) 3234.49,1896.91 cw(c3234.49,1891.91) 3239.49,1891.91 3239.49,1869.69 ccw(c3254.62,1869.69) 3254.62,1854.57 ccw(c3254.62,1869.69) 3269.75,1869.69 3269.75,1887.01 cw(c3274.75,1887.01) 3274.75,1892.01 cw(c3274.75,1887.01) 3279.75,1887.01 3279.75,1869.69 ccw(c3294.87,1869.69) 3294.87,1854.57 ccw(c3294.87,1869.69) 3310,1869.69 3310,1892.92 cw(c3315,1892.92) 3315,1897.92 cw(c3315,1892.92) 3320,1892.92 3320,1887.17 ccw(c3335.13,1887.17) 3335.13,1872.05 3375.38,1872.05 ccw(c3375.38,1887.17) 3390.51,1887.17 3390.51,1891.87 cw(c3395.51,1891.87) 3395.51,1896.87 cw(c3395.51,1891.87) 3400.51,1891.87 3400.51,1887.17 ccw(c3415.63,1887.17) 3415.63,1872.05 3493.87,1872.05 3596.97,1872.05 3607.42,1882.51 3627,1902.09 cw(c3630.54,1898.55) 3634.09,1902.07 3639.47,1896.69 ccw(c3650.16,1907.39) 3660.86,1896.69 ccw(c3650.16,1907.39) 3660.86,1918.09 3655.47,1923.48 cw(c3659,1927.01) 3655.47,1930.55 3687.46,1962.54 3758.87,2033.95 3788.88,2063.96 3796.63,2071.71 3847.04,2071.71 3848.41,2070.33 3863.72,2070.33 J9.29@3867.13,2066.93
USERIO.USRIO_12_P: J9.30 U18.D18 | length 1690.8
  F.Cu w5: U18.D18@2816.93,1580.22 2823.87,1587.16 2823.87,1720.08 2985.96,1882.17 3045.79,1882.17 3053.35,1882.17 ccw(c3053.35,1887.17) 3058.35,1887.17 3058.35,1892.92 cw(c3073.48,1892.92) 3073.48,1908.04 cw(c3073.48,1892.92) 3088.61,1892.92 3088.61,1869.69 ccw(c3093.6,1869.69) 3093.6,1864.69 ccw(c3093.61,1869.69) 3098.6,1869.69 3098.6,1892.92 cw(c3113.73,1892.92) 3113.73,1908.04 cw(c3113.73,1892.92) 3128.86,1892.92 3128.86,1887.17 ccw(c3133.86,1887.17) 3133.86,1882.17 3214.37,1882.17 ccw(c3214.37,1887.17) 3219.37,1887.17 3219.37,1891.91 cw(c3234.49,1891.91) 3234.49,1907.03 cw(c3234.49,1891.91) 3249.62,1891.91 3249.62,1869.69 ccw(c3254.62,1869.69) 3254.62,1864.69 ccw(c3254.62,1869.69) 3259.62,1869.69 3259.62,1887.01 cw(c3274.75,1887.01) 3274.75,1902.14 cw(c3274.75,1887.01) 3289.87,1887.01 3289.87,1869.69 ccw(c3294.87,1869.69) 3294.87,1864.69 ccw(c3294.87,1869.69) 3299.87,1869.69 3299.87,1892.92 cw(c3315,1892.92) 3315,1908.04 cw(c3315,1892.92) 3330.13,1892.92 3330.13,1887.17 ccw(c3335.13,1887.17) 3335.13,1882.17 3375.38,1882.17 ccw(c3375.38,1887.17) 3380.38,1887.17 3380.38,1891.87 cw(c3395.51,1891.87) 3395.51,1906.99 cw(c3395.51,1891.87) 3410.63,1891.87 3410.63,1887.17 ccw(c3415.63,1887.17) 3415.63,1882.17 3493.87,1882.17 3592.77,1882.17 3600.26,1889.67 3619.84,1909.25 cw(c3630.54,1898.55) 3639.51,1910.73 3639.75,1910.73 3641.21,1909.27 ; 3641.24,1909.25 3643.6,1906.89 3646.63,1903.85 ccw(c3650.16,1907.39) 3653.7,1903.85 ccw(c3650.16,1907.39) 3653.7,1910.93 3648.31,1916.32 cw(c3659,1927.01) 3648.31,1937.71 3680.3,1969.7 3760.67,2050.07 3762.44,2051.84 ccw(c3758.9,2055.37) 3762.44,2058.91 3759.76,2061.58 cw(c3763.3,2065.12) 3759.76,2068.65 cw(c3763.3,2065.12) 3766.83,2068.65 3769.51,2065.98 ccw(c3773.04,2069.52) 3776.58,2065.98 3785.75,2075.16 3792.43,2081.84 3847.04,2081.84 3848.41,2083.21 3863.72,2083.21 J9.30@3867.13,2086.61
VARIANT: R81.2 R82.2 U18.K18 | length 110.2
  F.Cu w6: U18.K18@3005.91,1580.22 3005.91,1644.68 R82.2@3011.81,1650.59
  F.Cu w10: R82.2@3011.81,1650.59 R81.2@3049.21,1650.59
VCM: "C104_4_ADC Driver 1.1" "C104_4_ADC Driver 2.1" "C104_4_ADC Driver 3.1" "C104_4_ADC Driver 4.1" "U12_4_ADC Driver 1.9" "U12_4_ADC Driver 2.9" "U12_4_ADC Driver 3.9" "U12_4_ADC Driver 4.9" C27.2 TP5.1 U6.48 U1008_4_CH1.13 U1008_4_CH2.13 U1008_4_CH3.13 U1008_4_CH4.13 | length 548
  F.Cu w10: U1008_4_CH4.13@1940.94,855.31 1965.62,855.31 v1(1981.72,839.22) ; U1008_4_CH3.13@1940.94,1662.4 1965.62,1662.4 v1(1981.72,1646.31) ; U1008_4_CH2.13@1940.94,2469.49 1965.62,2469.49 v1(1981.72,2453.39) ; U1008_4_CH1.13@1940.94,3276.57 1965.62,3276.57 v1(1981.72,3260.48) ; v1(2301.18,2535.43) 2336.48,2570.73 2336.48,2581.69 ; v1(2519.69,2535.43) 2554.99,2570.73 2554.99,2581.69 ; v1(2563.98,2328.74) 2575.51,2317.2 U6.48@2575.51,2301.18 ; v1(2738.19,2535.43) 2773.49,2570.73 2773.49,2581.69 ; v1(2956.7,2535.43) 2992,2570.73 2992,2581.69
  B.Cu w10: C27.2@2563.58,2302.17 2563.58,2328.35 v1(2563.98,2328.74) TP5.1@2603.35,2368.11
VOUT1: U2.13 U3.6 | length 295.9
  F.Cu w6: U2.13@2328.54,3251.97 2328.54,3291.09 cw(c2340.54,3291.09) 2332.08,3299.6 2369.54,3337.06 cw(c2378,3328.55) 2378,3340.55 2456.45,3340.55 ccw(c2456.45,3352.55) 2464.91,3344.04 2501.23,3380.37 ccw(c2492.73,3388.83) 2504.73,3388.83 U3.6@2504.73,3425.2
VOUT2: U2.10 U3.7 | length 371.5
  F.Cu w6: U2.10@2251.77,3251.97 2251.77,3326.53 cw(c2263.77,3326.53) 2255.26,3334.99 2271.13,3350.85 cw(c2279.58,3342.33) 2279.58,3354.33 2446.6,3354.33 ccw(c2446.6,3366.33) 2455.07,3357.82 2481.55,3384.3 ccw(c2473.04,3392.77) 2485.04,3392.77 U3.7@2485.04,3425.2
VOUT3: U2.7 U3.8 | length 381
  F.Cu w6: U2.7@2200.59,3484.25 2200.59,3445.13 ccw(c2212.59,3445.13) 2204.07,3436.68 2269.16,3371.59 ccw(c2277.61,3380.11) 2277.61,3368.11 2438.73,3368.11 ccw(c2438.73,3380.11) 2447.19,3371.6 2461.86,3386.27 ccw(c2453.35,3394.73) 2465.35,3394.73 U3.8@2465.35,3425.2
VOUT4: U2.2 U3.9 | length 229
  F.Cu w6: U2.2@2328.54,3484.25 2328.54,3431.15 ccw(c2340.54,3431.15) 2332.03,3422.69 2369.34,3385.38 ccw(c2377.81,3393.89) 2377.81,3381.89 2430.86,3381.89 ccw(c2430.86,3393.89) 2439.32,3385.38 2442.18,3388.24 ccw(c2433.67,3396.7) 2445.67,3396.7 U3.9@2445.67,3425.2
WAKE#: P1.B11
pads on no net: FID1.1 FID2.1 J8.1 J8.7 J8.9 J8.11 J8.21 J8.23 J8.25 J8.27 J8.29 J8.31 J8.33 J8.35 J8.37 J8.39 J8.41 J8.43 J8.45 J8.47 J8.51 J8.53 J8.55 J8.57 J8.67 J8.68 J8.75 J8.Un1 J8.Un2 P1.A9 P1.A10 P1.A19 P1.A32 P1.B8 U1.1 U3.5 U7.2 U7.3 U7.5 U7.6 U7.9 U7.12 U7.13 U7.20 U7.34 U7.35 U7.37 U7.38 U7.40 U7.41 U7.44 U7.45 U7.52 U7.53 U7.55 U7.56 U8.6 U9.4 U10.3 U10.5 U10.6 U10.13 U16.4 U18.D5 U18.D6 U18.D10 U18.H14 U18.J4 U18.J5 U18.J6 U18.J14 U18.K1 U18.K2 U18.K3 U18.K5 U18.K6 U18.L2 U18.L3 U18.L4 U18.L5 U18.L14 U18.M1 U18.M2 U18.M4 U18.M5 U18.M6 U18.N1 U18.N2 U18.N3 U18.N4 U18.N6 U18.P1 U18.P3 U18.P4 U18.P5 U18.P6 U18.R1 U18.R2 U18.R3 U18.R5 U18.R6 U18.R7 U18.T2 U18.T3 U18.T4 U18.T5 U18.T7 U18.U1 U18.U2 U18.U4 U18.U5 U18.U6 U18.U7 U18.V2 U18.V3 U18.V4 U18.V6 U18.V7 U18.V8 U22.5 U23.6 U1001_4_CH1.12 U1001_4_CH2.12 U1001_4_CH3.12 U1001_4_CH4.12 U1008_4_CH1.1 U1008_4_CH1.2 U1008_4_CH1.16 U1008_4_CH2.1 U1008_4_CH2.2 U1008_4_CH2.16 U1008_4_CH3.1 U1008_4_CH3.2 U1008_4_CH3.16 U1008_4_CH4.1 U1008_4_CH4.2 U1008_4_CH4.16 U1009_4_CH1.9 U1009_4_CH1.13 U1009_4_CH1.16 U1009_4_CH2.9 U1009_4_CH2.13 U1009_4_CH2.16 U1009_4_CH3.9 U1009_4_CH3.13 U1009_4_CH3.16 U1009_4_CH4.9 U1009_4_CH4.13 U1009_4_CH4.16

## Polygon pours and split planes (outlines as drawn)
GND on F.Cu "F.Cu--71" (solid, remove dead copper, pour order 340): 157.48,3641.73 4094.49,3641.73 4094.49,-196 157.48,-196
+1V8A on F.Cu "F.Cu--14" (solid, remove dead copper, pour order 226): 2885.72,2176.18 2834.56,2176.18 2834.56,2202.93 2885.72,2202.93
+1V2_MGT on F.Cu "F.Cu--29" (solid, remove dead copper, pour order 238): 2502.16,1296.65 2502.16,1220.67 2377.36,1220.67 2371.06,1214.37 2371.06,1188.98 2361.21,1188.98 2361.21,1214.37 2351.38,1214.37 2351.38,1188.98 2341.54,1188.98 2341.53,1214.57 2341.53,1231.69 2341.53,1250.98 2351.57,1261.02 2351.57,1296.65
+1V8D on F.Cu "F.Cu--60" (solid, remove dead copper, pour order 219): 2516.73,2179.53 2516.73,2128.37 2465.97,2128.37 2465.97,2179.53
+1V0_R on F.Cu "F.Cu--68" (solid, remove dead copper, pour order 258): 3622.05,1103.35 3488.19,1103.35 3466.54,1081.69 3341.54,1081.69 3341.54,983.27 3551.18,983.27 3551.18,1033.46 3558.07,1040.35 3622.05,1040.35
NetL2_1 on F.Cu "F.Cu--11" (solid, remove dead copper, pour order 248): 3440.94,1180.12 3440.94,1191.93 3468.5,1191.93 3488.19,1211.61 3615.16,1211.61 3615.16,1159.45 3489.17,1159.45 3468.5,1180.12
NetL5_1 on F.Cu "F.Cu--46" (solid, remove dead copper, pour order 247): 3523.62,1392.18 3523.62,1380.36 3496.06,1380.36 3478.35,1362.65 3351.38,1362.65 3351.38,1411.86 3476.38,1411.86 3496.06,1392.18
NetL4_1 on F.Cu "F.Cu--21" (solid, remove dead copper, pour order 246): 2344.49,1655.51 2344.49,1643.7 2316.93,1643.7 2297.24,1624.02 2172.24,1624.02 2172.24,1676.18 2296.26,1676.18 2316.93,1655.51
NetL3_1 on F.Cu "F.Cu--53" (solid, remove dead copper, pour order 244): 2262.8,1446.85 2262.8,1458.66 2290.35,1458.66 2310.04,1478.35 2427.76,1478.35 2427.76,1426.18 2311.02,1426.18 2290.35,1446.85
+VUSB on F.Cu "F.Cu--52" (solid, remove dead copper, pour order 242): 2262.8,1466.54 2262.8,1489.76 2247.64,1506.61 2247.64,1599.52 2288.39,1635.83 2344.49,1635.83 2344.49,1612.99 2359.45,1598.03 2359.45,1501.97 2324.02,1466.54
+VUSB on F.Cu "F.Cu--16" (solid, remove dead copper, pour order 241): 3440.94,1199.8 3440.94,1223.03 3425.79,1239.87 3425.79,1332.79 3470.46,1372.59 3523.43,1372.59 3523.43,1345.47 3538.78,1330.12 3538.78,1236.42 3502.17,1199.8
+VUSB_R on F.Cu "F.Cu--26" (solid, remove dead copper, pour order 240): 3771.06,3205.12 3743.5,3205.12 3743.5,3137.8 3721.46,3137.8 3721.46,3011.61 3647.64,3011.61 3647.64,2943.5 3785.83,2943.5 3785.83,3138.19 3771.06,3152.95
NetL1_2 on F.Cu "F.Cu--22" (solid, remove dead copper, pour order 239): 3802.56,3225.79 3802.56,3211.02 3829.58,3211.02 3848.42,3192.18 3848.42,3021.65 3897.24,3021.65 3897.24,3185.83 3857.28,3225.79
+5V3 on F.Cu "F.Cu--24" (solid, remove dead copper, pour order 233): 25 vertices, not listed, extent 3137.47,3232.28 3952.98,3531.5
+5V3_R_CP on F.Cu "F.Cu--2" (solid, remove dead copper, pour order 230): 3132.09,3405.91 3132.09,3531.57 3086.61,3531.57 3086.61,3439.37 3110.63,3414.76 3110.63,3405.91
-5V_R on F.Cu "F.Cu--33" (solid, remove dead copper, pour order 229): 3110.04,3356.69 3110.04,3242.52 3171.26,3242.52 3171.26,3267.18 3156.5,3281.89 3156.5,3323.23 3131.89,3347.83 3131.89,3356.69
+2V5_R on F.Cu "F.Cu--41" (solid, remove dead copper, pour order 259): 2165.35,1732.28 2299.21,1732.28 2320.87,1753.94 2351.87,1753.94 2364.57,1766.54 2404.53,1766.54 2404.53,1840.55 2364.17,1840.55 2279.53,1840.55 2273.62,1846.46 2236.22,1846.46 2236.22,1808.07 2223.43,1795.28 2165.35,1795.28
+3V3_R on F.Cu "F.Cu--9" (solid, remove dead copper, pour order 257): 3336.61,1468.95 3476.38,1468.95 3498.03,1490.55 3536.88,1490.55 3546.85,1480.59 3546.85,1469.59 3581.1,1469.59 3581.1,1532.68 3542.13,1571.56 3542.13,1590.01 3411.02,1590.01 3411.02,1542.37 3406.5,1537.84 3336.61,1537.84
+1V8_R on F.Cu "F.Cu--32" (solid, remove dead copper, pour order 256): 17 vertices, not listed, extent 2160.63,1230.31 2427.56,1369.09
-5V on F.Cu "F.Cu--19" (solid, remove dead copper, pour order 293): 3140.55,3231.5 3140.55,3161.42 3162.99,3161.42 3162.99,3093.9 3082.68,3093.9 3082.68,3231.5
-5V on F.Cu "F.Cu--50" (solid, remove dead copper, pour order 296): 2856.79,3386.81 2856.79,3464.25 2836.61,3484.25 2836.61,3549.61 2881.99,3549.61 2881.99,3386.81
+5V on F.Cu "F.Cu--13" (solid, remove dead copper, pour order 292): 2919.19,3320.87 2919.19,3228.74 2928.35,3220.51 2928.35,3157.48 2885.04,3157.48 2885.04,3220.11 2894,3228.74 2894,3320.87
+5V on F.Cu "F.Cu--10" (solid, remove dead copper, pour order 291): 2618.11,3390.94 2618.11,3487.01 2618.11,3550.2 2661.51,3550.2 2661.51,3487.57 2652.56,3478.94 2652.56,3423.62 2659.84,3416.54 2659.84,3390.94
+3V3_ACQ on F.Cu "F.Cu--66" (solid, remove dead copper, pour order 262): 2374.02,2264.76 2456.69,2264.76 2456.69,2344.49 2470.47,2358.27 2513.78,2358.27 2513.78,2415.35 2407.48,2415.35 2407.48,2318.9 2374.02,2285.43
+VUSB_R_ACQ on F.Cu "F.Cu--61" (solid, remove dead copper, pour order 261): 2307.09,2264.76 2224.41,2264.76 2224.41,2344.49 2210.63,2358.27 2167.32,2358.27 2167.32,2415.35 2273.62,2415.35 2273.62,2318.9 2307.09,2285.43
+2V5_R_ACQ on F.Cu "F.Cu--1" (solid, remove dead copper, pour order 260): 17 vertices, not listed, extent 2237.2,1846.46 2398.82,1986.22
+1V8_ACQ on F.Cu "F.Cu--67" (solid, remove dead copper, pour order 237): 18 vertices, not listed, extent 2237.2,2053.15 2426.38,2154.53
+5V on F.Cu "F.Cu--17" (solid, remove dead copper, pour order 236): 3336.61,3099.61 3336.61,3174.02 3461.42,3174.02 3467.72,3180.32 3467.72,3205.71 3477.56,3205.71 3477.56,3180.32 3487.4,3180.32 3487.4,3205.71 3497.24,3205.71 3497.24,3180.12 3497.24,3162.99 3497.24,3140.94 3455.91,3099.61
+1V8_R_LDO on F.Cu "F.Cu--36" (solid, remove dead copper, pour order 235): 17 vertices, not listed, extent 2341.53,982.28 2502.16,1122.05
+5V3_R_LDO on F.Cu "F.Cu--3" (solid, remove dead copper, pour order 234): 3336.61,3412.4 3336.61,3304.33 3461.42,3304.33 3467.72,3298.03 3467.72,3272.64 3477.56,3272.64 3477.56,3298.03 3487.4,3298.03 3487.4,3272.64 3497.24,3272.64 3497.24,3298.23 3497.24,3358.27 3406.3,3358.27 3399.61,3364.96 3399.61,3412.4
+1V8A on F.Cu "F.Cu--48" (solid, remove dead copper, pour order 220): 2901.18,2292.32 2850.02,2292.32 2850.02,2402.14 2901.18,2402.14
+5V on F.Cu "F.Cu--69" (solid, remove dead copper, pour order 200): 1888.81,1033.89 1914.4,1033.89 1914.4,1052 1969.52,1052 1969.52,1114.17 1888.81,1114.17
+5V on F.Cu "F.Cu--63" (solid, remove dead copper, pour order 199): 1888.81,3455.15 1914.4,3455.15 1914.4,3473.26 1969.52,3473.26 1969.52,3535.43 1888.81,3535.43
+5V on F.Cu "F.Cu--43" (solid, remove dead copper, pour order 198): 1888.81,1840.97 1914.4,1840.97 1914.4,1859.08 1969.52,1859.08 1969.52,1921.26 1888.81,1921.26
+5V on F.Cu "F.Cu--12" (solid, remove dead copper, pour order 197): 1888.81,2648.06 1914.4,2648.06 1914.4,2666.17 1969.52,2666.17 1969.52,2728.35 1888.81,2728.35
+VPGA_CH4 on F.Cu "F.Cu--64" (solid, remove dead copper, pour order 184): 1812.99,974.41 1812.99,1059.06 1835.04,1059.06 1835.04,1114.17 1878.4,1114.17 1878.4,974.41
+VPGA_CH2 on F.Cu "F.Cu--37" (solid, remove dead copper, pour order 183): 1812.99,2588.58 1812.99,2673.23 1835.04,2673.23 1835.04,2728.35 1878.4,2728.35 1878.4,2588.58
+VPGA_CH1 on F.Cu "F.Cu--62" (solid, remove dead copper, pour order 182): 1812.99,3395.67 1812.99,3480.32 1835.04,3480.32 1835.04,3535.43 1878.4,3535.43 1878.4,3395.67
+VPGA_CH3 on F.Cu "F.Cu--54" (solid, remove dead copper, pour order 181): 1812.99,1781.5 1812.99,1866.14 1835.04,1866.14 1835.04,1921.26 1878.4,1921.26 1878.4,1781.5
+1V8APLL on F.Cu "F.Cu--47" (solid, remove dead copper, pour order 326): 3019.68,2160.83 3019.68,2235.24 2995.08,2235.24 2995.08,2216.54 2974.41,2216.54 2974.41,2160.83
+5V on F.Cu "F.Cu--70" (solid, remove dead copper, pour order 299): 2439.17,3205.51 2439.17,3156.5 2413.98,3156.5 2413.98,3205.51
+3V3_ACQ on F.Cu "F.Cu--58" (solid, remove dead copper, pour order 298): 2999.8,2095.08 2950.79,2095.08 2950.79,2120.28 2999.8,2120.28
+5V on F.Cu "F.Cu--56" (solid, remove dead copper, pour order 297): 2318.5,3205.51 2318.5,3156.5 2293.31,3156.5 2293.31,3205.51
NetC124_2 on F.Cu "F.Cu--39" (solid, remove dead copper, pour order 295): 3516.73,3314.96 3510.83,3314.96 3500.98,3324.81 3500.98,3358.27 3526.57,3358.27 3526.57,3324.8
+3V3_ACQ on F.Cu "F.Cu--7" (solid, remove dead copper, pour order 290): 3061.27,2385.83 3052.76,2394.34 3052.76,2442.91 3077.95,2442.91 3077.95,2394.67 3069.11,2385.83
+1V8D on F.Cu "F.Cu--28" (solid, remove dead copper, pour order 228): 2885.72,2129.92 2834.56,2129.92 2834.56,2156.67 2885.72,2156.67
+1V8A on F.Cu "F.Cu--18" (solid, pour order 227): 2516.73,2289.96 2516.73,2238.8 2465.97,2238.8 2465.97,2289.96
+3V3_PGA on F.Cu "F.Cu--65" (solid, remove dead copper, pour order 215): 1986.22,2922.05 1948.82,2922.05 1948.82,3062.8 1986.22,3062.8
+5V_R_PGA on F.Cu "F.Cu--27" (solid, remove dead copper, pour order 214): 1836.61,2922.05 1874.02,2922.05 1874.02,3068.7 1836.61,3068.7
NetC178_1 on F.Cu "F.Cu--51" (solid, remove dead copper, pour order 179): 2192.32,1304.33 2165.94,1304.34 2165.94,1404.53 2192.32,1404.53
NetC186_1 on F.Cu "F.Cu--30" (solid, remove dead copper, pour order 178): 2410.04,1833.46 2435.24,1833.46 2435.43,1833.27 2435.43,1695.87 2410.04,1695.87
NetC74_1 on F.Cu "F.Cu--4" (solid, remove dead copper, pour order 177): 3586.22,1532.72 3612.6,1532.72 3612.6,1432.53 3586.22,1432.53
+3V3_ACQ on F.Cu "F.Cu--59" (solid, remove dead copper, pour order 176): 2980.32,2604.33 2980.32,2673.23 2883.47,2673.23 2883.47,2604.33
+3V3_ACQ on F.Cu "F.Cu--49" (solid, remove dead copper, pour order 175): 2324.8,2604.33 2324.8,2673.23 2227.95,2673.23 2227.95,2604.33
+3V3_ACQ on F.Cu "F.Cu--45" (solid, remove dead copper, pour order 174): 2761.82,2604.33 2761.82,2673.23 2664.97,2673.23 2664.97,2604.33
+3V3_ACQ on F.Cu "F.Cu--23" (solid, remove dead copper, pour order 173): 2543.31,2604.33 2543.31,2673.23 2446.46,2673.23 2446.46,2604.33
-VBIAS on F.Cu "F.Cu--5" (solid, remove dead copper, pour order 172): 2931.2,3527.95 2957.19,3527.95 2957.19,3442.72 2931.2,3442.72
+1V0 on F.Cu "F.Cu--55" (solid, remove dead copper, pour order 310): 3559.05,1033.46 3610.24,1033.46 3610.24,952.26 3583.17,925.2 3412.4,925.2 3412.4,976.38 3559.05,976.38
+2V5 on F.Cu "F.Cu--44" (solid, remove dead copper, pour order 255): 2232.28,1801.18 2232.28,1847.44 2330.91,1847.44 2330.91,1891.73 2165.55,1891.73 2165.55,1801.18
+1V8 on F.Cu "F.Cu--15" (solid, remove dead copper, pour order 254): 2244.09,1224.41 2156,1224.41 2156,1148 2244.09,1148
+3V3 on F.Cu "F.Cu--35" (solid, remove dead copper, pour order 253): 3404.92,1543.75 3404.92,1612.65 3336.61,1612.65 3336.61,1543.75
+VUSB on F.Cu "F.Cu--6" (solid, remove dead copper, pour order 252): 2218.5,2352.36 2167.32,2352.36 2167.32,2264.76 2218.5,2264.76
+1V8 on F.Cu "F.Cu--8" (solid, remove dead copper, pour order 251): 2433.07,982.28 2433.07,1033.46 2347.44,1033.46 2347.44,982.28
+VUSB on F.Cu "F.Cu-" (solid, remove dead copper, pour order 232): 3952.95,3365.16 3889.17,3365.16 3889.17,3305.12 3952.95,3305.12
+VUSB on F.Cu "F.Cu--40" (solid, remove dead copper, pour order 231): 3647.64,3018.31 3715.94,3018.31 3715.94,3084.25 3647.64,3084.25
NetR93_1 on F.Cu "F.Cu--25" (solid, remove dead copper, pour order 294): 3146.85,3231.5 3209.25,3231.5 3209.25,3206.3 3146.85,3206.3
NetR100_1 on F.Cu "F.Cu--42" (solid, remove dead copper, pour order 250): 3458.86,3095.47 3458.86,3119.09 3481.99,3119.09 3496.26,3133.37 3496.26,3158.46 3506.89,3169.29 3508.86,3169.29 3519.88,3158.46 3519.88,3095.47
NetR99_1 on F.Cu "F.Cu--38" (solid, remove dead copper, pour order 249): 2265.75,2162.4 2265.75,2138.78 2237.7,2138.78 2228.35,2129.43 2228.35,2099.41 2204.72,2099.41 2204.72,2162.4
+5V on F.Cu "F.Cu--31" (solid, remove dead copper, pour order 216): 1878.35,3038.58 1878.35,3012.99 1912.4,3012.99 1912.4,3085.63 1878.35,3085.63
NetR125_2 on F.Cu "F.Cu--57" (solid, remove dead copper, pour order 180): 2319.68,1296.85 2346.06,1296.85 2346.06,1235.24 2319.68,1235.24
+12V_PCIe on F.Cu "F.Cu--20" (solid, remove dead copper, pour order 201): 1783.46,49.21 1783.46,113.19 1889.76,113.19 1889.76,70.87 1889.76,49.21
GND on B.Cu "B.Cu-" (solid, remove dead copper, pour order 338): 157.48,3641.73 4094.49,3641.73 4094.49,-196.85 157.48,-196.85